# Altium PCB PCB1.PcbDoc
Units mil, origin at the board's own origin, x right, y up, seen from the top; angles counter-clockwise.
Board outline 6000 x 4000 mil, 2 copper layers (Top Layer, Bottom Layer); 158 components, 75 nets, 469 pads, 0 vias.
Unrouted connection lines stored in the file: 227.
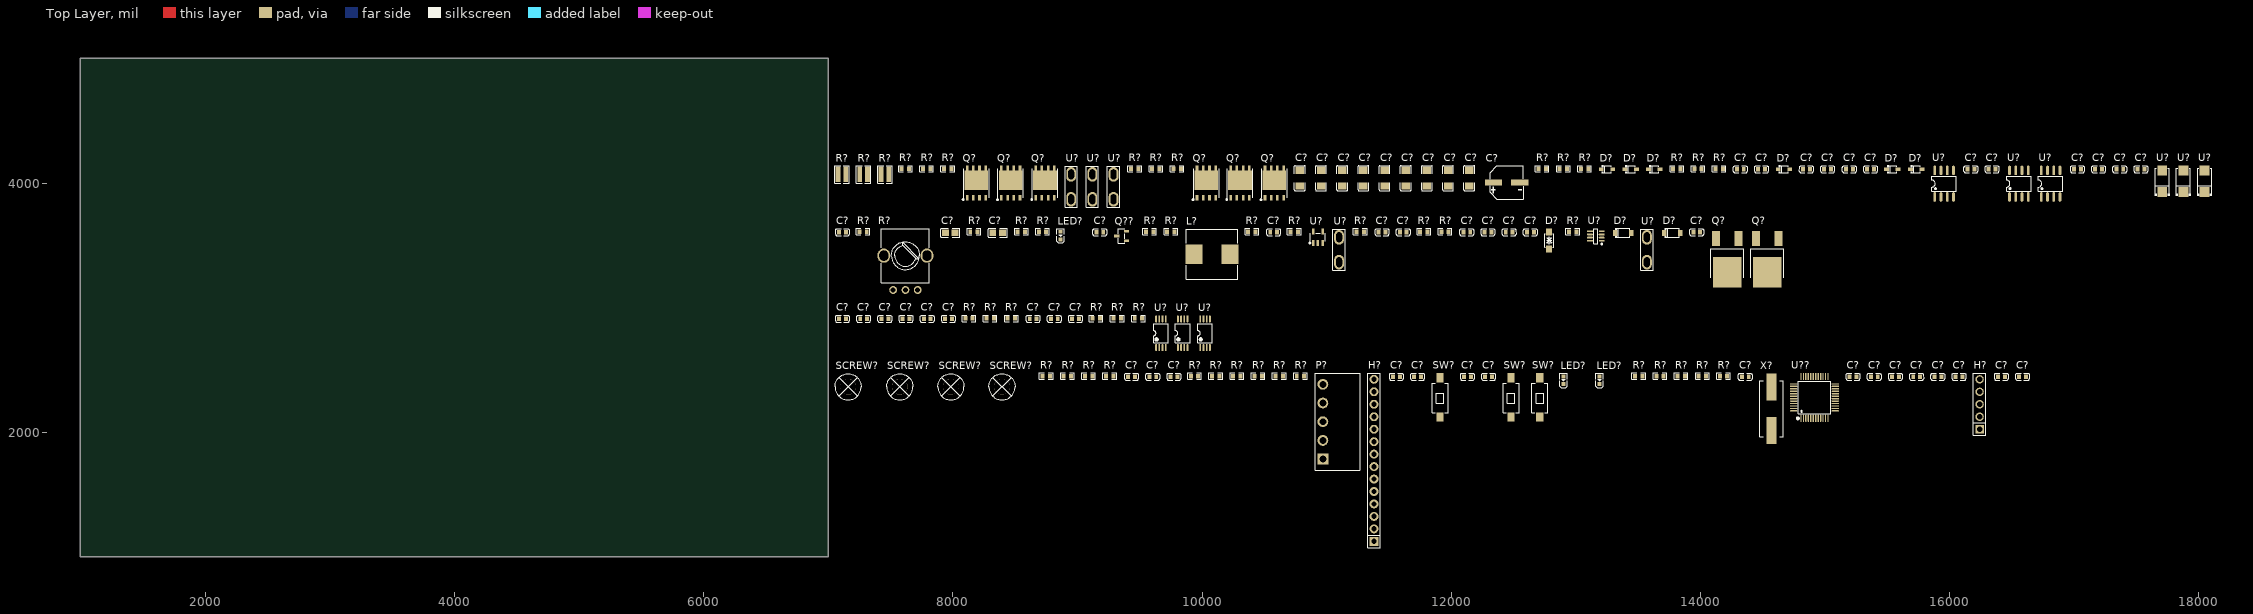
[diagram p0: Top Layer view]
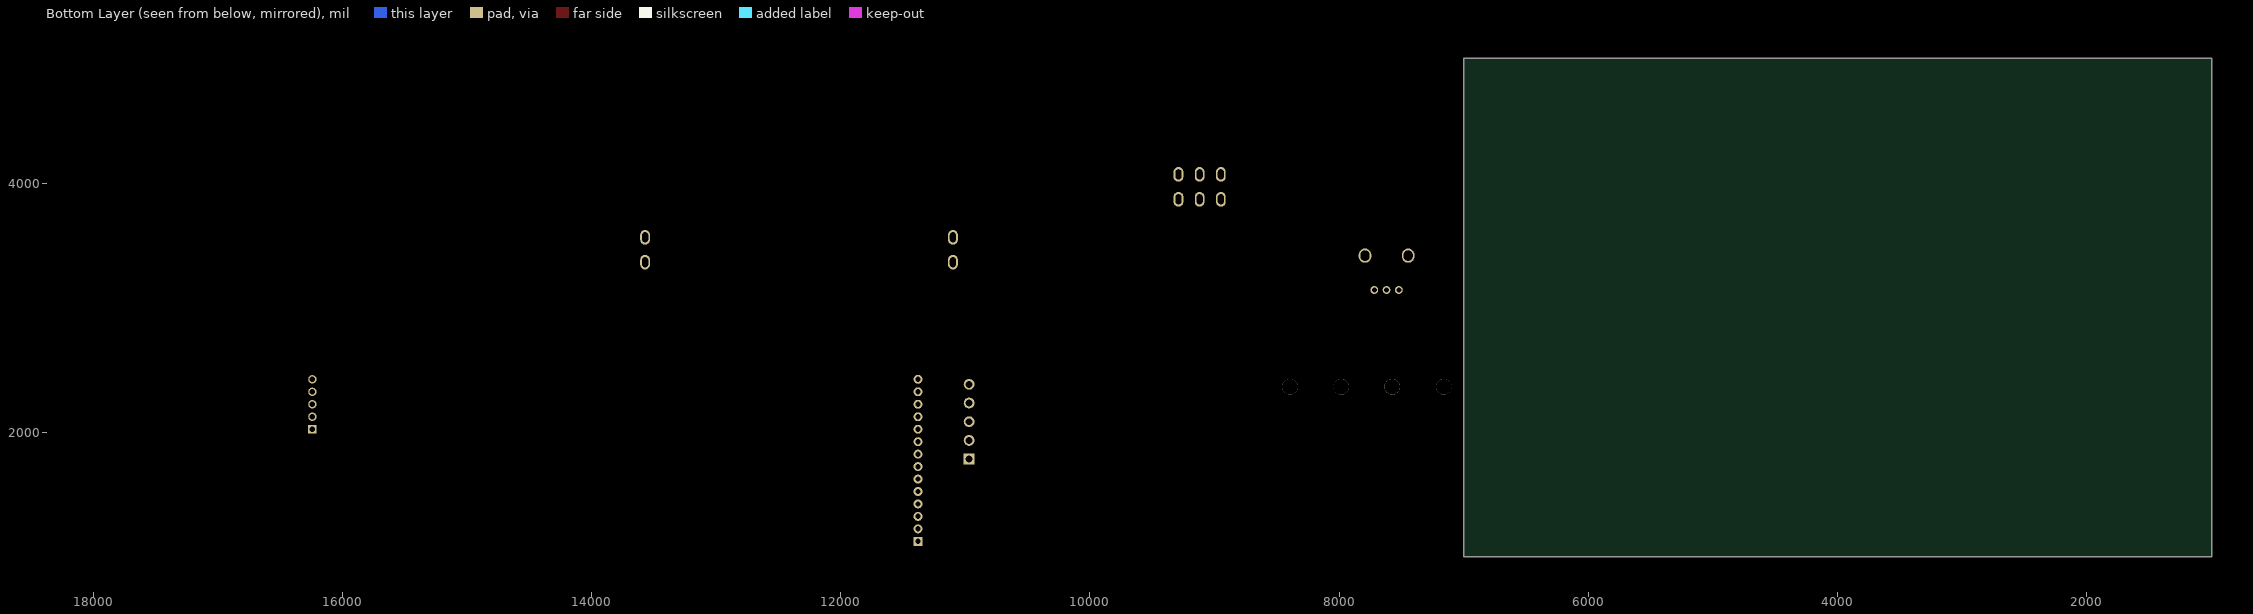
[diagram p1: Bottom Layer view, seen from below]

## Layer stack, top to bottom
Top Solder: solder mask 0.4, Solder Resist, Dk 3.5
Top Layer: signal copper 1.4
Dielectric 1: dielectric 12.6, FR-4, Dk 4.8
Bottom Layer: signal copper 1.4
Bottom Solder: solder mask 0.4, Solder Resist, Dk 3.5

## Board outline
1000,1000 7000,1000 7000,5000 1000,5000

## Design rules (kind name [scope] priority, off if disabled: settings)
Clearance [All] p1: gap=10 ignorepadtopadclearanceinfootprint=FALSE except(0: Arc-Hole Track-Hole SMDPad-Hole THPad-Hole Via-Hole Fill-Hole Poly-Hole Region-Hole Text-Hole)
PolygonConnect [All] p1: connectstyle=Relief reliefconductorwidth=10 reliefentries=4 polygonreliefangle="90 Angle" airgapwidth=10
RoomDefinition PreDriver [InComponentClass('PreDriver')] p1: confinementstyle=ConfineIn formatcopy=TRUE lockcomponents=FALSE outline 7045,2405 18115,2405 18115,4250 7045,4250
RoomDefinition POWER [InComponentClass('POWER')] p2: confinementstyle=ConfineIn formatcopy=TRUE lockcomponents=FALSE outline 7045,2350 18115,2350 18115,4250 7045,4250
RoomDefinition OPA [InComponentClass('OPA')] p3: confinementstyle=ConfineIn formatcopy=TRUE lockcomponents=FALSE outline 7045,2405 18115,2405 18115,4250 7045,4250
RoomDefinition MCU [InComponentClass('MCU')] p4: confinementstyle=ConfineIn formatcopy=TRUE lockcomponents=FALSE outline 7045,1065 17600,1065 17600,4250 7045,4250
RoutingVias [All] p1: holewidth=28 width=50 viastyle="Through Hole" minholewidth=28 minwidth=50 maxholewidth=28 maxwidth=50
SolderMaskExpansion [All] p1: expansion=4 istentingtop=FALSE
Width [All] p1: maxlimit=10 minlimit=10 preferedwidth=10
30 further rules are at their usual default settings.

## Classes and differential pairs
component class PreDriver: C? D? Q? R? U?
component class POWER: C? D? L? LED? Q? Q?? R? U?
component class OPA: C? R? U?
component class MCU: C? H? LED? P? R? SCREW? SW? U?? X?

## Components (designator, comment, footprint, x,y, rotation, side; value= is the part's Value field where it differs from the comment)
C? "1uF" C0603 15905,2445 r0 top
C? "100nF" C0603 12130,2445 r0 top
C? "1nF" C0603 9605,2445 r0 top
C? "100nF" C0603 11730,2445 r0 top
C? "100nF" C0603 15735,2445 r0 top
C? "100nF" C0603 16075,2445 r0 top
C? "100nF" C0603 11560,2445 r0 top
C? "1nF" C0603 9775,2445 r0 top
C? "1nF" C0603 9435,2445 r0 top
C? "100nF" C0603 15395,2445 r0 top
C? "100nF" C0603 16415,2445 r0 top
C? "My_Library_Cap-0603" C0603 14360,2445 r0 top value=22pF
C? "100nF" C0603 12300,2445 r0 top
C? "1uF" C0603 15565,2445 r0 top
C? "My_Library_Cap-0603" C0603 16585,2445 r0 top value=22pF
C? "1uF" C0603 15225,2445 r0 top
C? "1 nF" C0603 8815,2910 r0 top
C? "0.1 μF" C0603 7625,2910 r0 top
C? "1 nF" C0603 8985,2910 r0 top
C? "0.1 μF" C0603 7965,2910 r0 top
C? "1 μF" C0603 7455,2910 r0 top
C? "0.1 μF" C0603 7795,2910 r0 top
C? "1 nF" C0603 8645,2910 r0 top
C? "1 μF" C0603 7115,2910 r0 top
C? "1 μF" C0603 7285,2910 r0 top
C? "22uF" C0603 12635,3605 r0 top
C? "1uF" C0603 11445,3605 r0 top
C? "100nF 0603" C0603 7115,3605 r0 top
C? "22uF" C0805 7980,3600 r0 top
C? "22uF" C0805 8360,3600 r0 top
C? "0.1uF" C0603 12295,3605 r0 top
C? "0.1uF" C0603 10575,3605 r0 top
C? "22uF" C0603 12125,3605 r0 top
C? "1uF" C0603 11615,3605 r0 top
C? "33pF" C0603 9180,3605 r0 top
C? "22uF" C0603 12465,3605 r0 top
C? "0.1uF" C0603 13970,3605 r0 top
C? "10 μF" C0603 14850,4110 r0 top
C? "100nF" C1206 11805,4040 r90 top
C? "1 μF" C0603 17195,4110 r0 top
C? "10uF" C1206 12145,4040 r90 top
C? "0.1 μF" C0603 15020,4110 r0 top
C? "100nF" C1206 11295,4040 r90 top
C? "1 μF" C0603 17535,4110 r0 top
C? "0.1 μF" C0603 17365,4110 r0 top
C? "10uF" C1206 11465,4040 r90 top
C? "0.1 μF" C0603 15365,4110 r0 top
C? "10 μF" C0603 14320,4110 r0 top
C? "10uF" C1206 11975,4040 r90 top
C? "1 μF" C0603 16340,4110 r0 top
C? "10uF" C1206 10955,4040 r90 top
C? "220uF" CAP-SMD_BD6.3-L6.6-W6.6-FD 12445,4005 r0 top
C? "0.1 μF" C0603 16170,4110 r0 top
C? "0.1 μF" C0603 14490,4110 r0 top
C? "10uF" C1206 11125,4040 r90 top
C? "10uF" C1206 11635,4040 r90 top
C? "0.1 μF" C0603 17025,4110 r0 top
C? "100nF" C1206 10785,4040 r90 top
C? "10 μF" C0603 15195,4110 r0 top
D? "BZT52C16" SOD-123_L2.7-W1.6-LS3.7-RD 13380,3600 r0 top
D? "SMF30CA" SOD-123_L2.7-W1.8-LS3.7-BI 12785,3540 r90 top
D? "BZT52C16" SOD-123_L2.7-W1.6-LS3.7-RD 13775,3600 r0 top
D? "1N4148WS" SOD-323_L1.8-W1.3-LS2.5-RD 13440,4110 r0 top
D? "1N4148WS" SOD-323_L1.8-W1.3-LS2.5-RD 15540,4110 r0 top
D? "1N4148WS" SOD-323_L1.8-W1.3-LS2.5-RD 13630,4110 r0 top
D? "1N4148WS" SOD-323_L1.8-W1.3-LS2.5-RD 14670,4110 r0 top
D? "1N4148WS" SOD-323_L1.8-W1.3-LS2.5-RD 13250,4110 r0 top
D? "1N4148WS" SOD-323_L1.8-W1.3-LS2.5-RD 15730,4110 r0 top
H? "HDR-M_2.54_1x5P" HDR-TH_5P-P2.54-V-M 16240,2225 r90 top
H? "HDR-M_2.54_1x14P" HDR-TH_14P-P2.54-V-M 11380,1775 r90 top
L? "5.5uH" IND-SMD_L10.5-W10.2-HSB-1050 10080,3430 r0 top
LED? "LED_0603-R" LED_0603 13190,2420 r90 top
LED? "LED_0603-R" LED_0603 12900,2420 r90 top
LED? "" LED_0603 8865,3580 r90 top
P? "WJ15EDGRC-3.81-5P" CONN-TH_5P-P3.81_WJ15EDGRC-3.81-5P 10970,2085 r90 top
Q? "AOD4185" TO-252-2_L6.6-W6.1-P4.57-LS9.9-BR-CW 14215,3420 r90 top
Q? "AOD4185" TO-252-2_L6.6-W6.1-P4.57-LS9.9-BR-CW 14535,3420 r90 top
Q? "ne006ng" DFN5X6-8_L5.8-W5.0-P1.27-LS6.2-BL-EP 8465,4000 r0 top
Q? "ne006ng" DFN5X6-8_L5.8-W5.0-P1.27-LS6.2-BL-EP 8740,4000 r0 top
Q? "ne006ng" DFN5X6-8_L5.8-W5.0-P1.27-LS6.2-BL-EP 10580,4000 r0 top
Q? "ne006ng" DFN5X6-8_L5.8-W5.0-P1.27-LS6.2-BL-EP 10305,4000 r0 top
Q? "ne006ng" DFN5X6-8_L5.8-W5.0-P1.27-LS6.2-BL-EP 8190,4000 r0 top
Q? "ne006ng" DFN5X6-8_L5.8-W5.0-P1.27-LS6.2-BL-EP 10035,4000 r0 top
Q?? "s8050_c20069125" SOT-23-3_L2.9-W1.3-P1.90-LS2.3-BR 9355,3575 r0 top
R? "4.7K" R0603 14015,2450 r0 top
R? "4.7K" R0603 13505,2450 r0 top
R? "0R" R0603 8750,2450 r0 top value=2K
R? "4.7K" R0603 14185,2450 r0 top
R? "0R" R0603 9260,2450 r0 top value=2K
R? "2K" R0603 10790,2450 r0 top
R? "2K" R0603 10280,2450 r0 top
R? "2K" R0603 10450,2450 r0 top
R? "4.7K" R0603 13845,2450 r0 top
R? "4.7K" R0603 13675,2450 r0 top
R? "0R" R0603 9090,2450 r0 top value=2K
R? "2K" R0603 10110,2450 r0 top
R? "2K" R0603 9940,2450 r0 top
R? "0R" R0603 8920,2450 r0 top value=2K
R? "2K" R0603 10620,2450 r0 top
R? "10R" R0603 9150,2915 r0 top
R? "10R" R0603 8300,2915 r0 top
R? "10R" R0603 9320,2915 r0 top
R? "10R" R0603 8470,2915 r0 top
R? "10R" R0603 9490,2915 r0 top
R? "10R" R0603 8130,2915 r0 top
R? "10K" R0603 8720,3610 r0 top
R? "40.2K" R0603 8550,3610 r0 top
R? "1K" R0603 11270,3610 r0 top value=10K
R? "My_Library_Res-0603" R0603 10400,3610 r0 top value=4.7k
R? "7.5K" R0603 8170,3610 r0 top
R? "4.7K" R0603 9750,3610 r0 top value=10K
R? "100K" R0603 11950,3610 r0 top
R? "20" R0603 10740,3610 r0 top
R? "20K" R0603 9580,3610 r0 top
R? "10K" R0603 12975,3610 r0 top
R? "10K" R0603 11780,3610 r0 top
R? "R09022N0-FB20B7.0-B503-000" RES-ADJ-TH_R09022N0-FB20B7B503-0004 7620,3280 r0 top
R? "1K 0603" R0603 7280,3610 r0 top
R? "5mΩ" R0612 7455,4070 r0 top
R? "20K" R0603 9630,4115 r0 top
R? "10R" R0603 12730,4115 r0 top
R? "20K" R0603 7790,4115 r0 top
R? "20K" R0603 9800,4115 r0 top
R? "20K" R0603 7960,4115 r0 top
R? "10R" R0603 14150,4115 r0 top
R? "10R" R0603 13070,4115 r0 top
R? "20K" R0603 9460,4115 r0 top
R? "10R" R0603 13980,4115 r0 top
R? "10R" R0603 12900,4115 r0 top
R? "20K" R0603 7620,4115 r0 top
R? "5mΩ" R0612 7110,4070 r0 top
R? "5mΩ" R0612 7285,4070 r0 top
R? "10R" R0603 13810,4115 r0 top
SCREW? "M3螺丝" "PCBComponent_1 - duplicate" 8395,2365 r90 top
SCREW? "M3螺丝" "PCBComponent_1 - duplicate" 7985,2365 r90 top
SCREW? "M3螺丝" "PCBComponent_1 - duplicate" 7160,2365 r90 top
SCREW? "M3螺丝" "PCBComponent_1 - duplicate" 7575,2365 r90 top
SW? "TS-1101-C-W" SW-SMD_L6.0-W3.3-LS8.0 12480,2280 r90 top
SW? "TS-1101-C-W" SW-SMD_L6.0-W3.3-LS8.0 12710,2280 r90 top
SW? "TS-1101-C-W" SW-SMD_L6.0-W3.3-LS8.0 11910,2280 r90 top
U? "INA240A2PWR" TSSOP-8_L4.4-W3.0-P0.65-LS6.4-BL 9670,2795 r0 top
U? "INA240A2PWR" TSSOP-8_L4.4-W3.0-P0.65-LS6.4-BL 9845,2795 r0 top
U? "INA240A2PWR" TSSOP-8_L4.4-W3.0-P0.65-LS6.4-BL 10025,2795 r0 top
U? "RT9013-33GB" SOT-23-5_L3.0-W1.7-P0.95-LS2.8-BL 10930,3565 r0 top
U? "EST026" CONN-TH_L6.3-W0.8-EST026 13570,3465 r90 top
U? "EST026" CONN-TH_L6.3-W0.8-EST026 11100,3465 r90 top
U? "MP2315GJ-Z" TSOT-23-8_L2.9-W1.6-P0.65-LS2.8-BR 13160,3575 r0 top
U? "SS310肖特基二极管SMA" SMA_L4.3-W2.6-LS5.1-R-RD 17705,4015 r90 top
U? "SS310肖特基二极管SMA" SMA_L4.3-W2.6-LS5.1-R-RD 18045,4015 r90 top
U? "EST026" CONN-TH_L6.3-W0.8-EST026 9290,3970 r90 top
U? "IR2101STRPBF" SOIC-8_L5.0-W4.0-P1.27-LS6.0-BL 16555,3995 r0 top
U? "IR2101STRPBF" SOIC-8_L5.0-W4.0-P1.27-LS6.0-BL 16810,3995 r0 top
U? "EST026" CONN-TH_L6.3-W0.8-EST026 9120,3970 r90 top
U? "EST026" CONN-TH_L6.3-W0.8-EST026 8950,3970 r90 top
U? "SS310肖特基二极管SMA" SMA_L4.3-W2.6-LS5.1-R-RD 17875,4015 r90 top
U? "IR2101STRPBF" SOIC-8_L5.0-W4.0-P1.27-LS6.0-BL 15955,3995 r0 top
U?? "stm32g473cbt6" LQFP-48_L7.0-W7.0-P0.50-LS9.0-BL 14915,2280 r0 top
X? "8MHz" CRYSTAL-SMD_L11.5-W4.8-LS12.7 14570,2190 r90 top

## Footprints (in the part's own frame and the unit in brackets; to place one, negate y for a bottom-side part, rotate by r counter-clockwise, add the part's x,y. Pads: shape width x height; smd on the part's side, far side on the other; paste and mask are expansions set on the pad)
C0603 [mil]
  rect 31.5x35.4 smd: 1(-27.58,0) 2(27.58,0)
  silkscreen extent -55,-28 55,28
C0805 [mm]
  rect 1.41x1.35 smd paste-100 mask+0.051: 1(-1,0) 2(1,0)
  silkscreen extent -1.96,-0.9 1.96,0.9
C1206 [mm]
  rect 1.485x1.728 smd paste-100 mask+0.051: 1(-1.593,0) 2(1.593,0)
  silkscreen extent -2.56,-1.09 2.56,1.09
CAP-SMD_BD6.3-L6.6-W6.6-FD [mm]
  rect 3.5x1.2 smd paste+0.051: 1(-2.67,0) 2(2.67,0)
  silkscreen extent -3.38,-3.38 3.38,3.38
CONN-TH_5P-P3.81_WJ15EDGRC-3.81-5P [mil]
  rect 86.6x86.6 hole 55.1: 1(-300,0)
  round 86.6 hole 55.1: 2(-150,0) 3(0,0) 4(150,0) 5(300,0)
  silkscreen extent -390,-300 390,63
CONN-TH_L6.3-W0.8-EST026 [mil]
  oval 118.1x78.7 hole 47.2 slot 78.7 at 0 deg: 1(-100,0) 2(100,0)
  silkscreen extent -165,-49 165,49
CRYSTAL-SMD_L11.5-W4.8-LS12.7 [mm]
  rect 5.5x2 smd paste+0.051: 1(-4.45,0) 2(4.45,0)
  silkscreen extent -5.7,-2.4 5.7,2.4
DFN5X6-8_L5.8-W5.0-P1.27-LS6.2-BL-EP [mm]
  rect 0.55x1.1 smd paste-100 mask+0.05: 1(-1.905,-3.025) 2(-0.635,-3.025) 3(0.635,-3.025) 4(1.905,-3.025) 5(1.905,3.025) 6(0.635,3.025) 7(-0.635,3.025) 8(-1.905,3.025)
  rect 4.8x4 smd paste-100 mask+0.05: 8(0,0.61)
  silkscreen extent -2.85,-3.53 2.6,2.92
HDR-TH_5P-P2.54-V-M [mil]
  rect 66.9x66.9 hole 43.3: 1(-200,0)
  round 66.9 hole 43.3: 2(-100,0) 3(0,0) 4(100,0) 5(200,0)
  silkscreen extent -250,-50 250,50
HDR-TH_14P-P2.54-V-M [mil]
  rect 70.9x70.9 hole 43.3: 1(-650,0)
  round 70.9 hole 43.3: 2(-550,0) 3(-450,0) 4(-350,0) 5(-250,0) 6(-150,0) 7(-50,0) 8(50,0) 9(150,0) 10(250,0) 11(350,0) 12(450,0) 13(550,0) 14(650,0)
  silkscreen extent -700,-49 700,49
IND-SMD_L10.5-W10.2-HSB-1050 [mm]
  rect 3.5x4 smd paste+0.051: 1(-3.65,0) 2(3.65,0)
  silkscreen extent -5.25,-5.1 5.25,5.1
LED_0603 [mil]
  rect 31.5x31.5 smd paste+0 mask+2: 1(-33.5,-0.4) 2(29.5,-0.2)
  silkscreen extent -61,-30 53,30
LQFP-48_L7.0-W7.0-P0.50-LS9.0-BL [mm]
  oval 0.27x1.5 smd paste+0 mask+0.05: 1(-2.75,-4.25) 2(-2.25,-4.25) 3(-1.75,-4.25) 4(-1.25,-4.25) 5(-0.75,-4.25) 6(-0.25,-4.25) 7(0.25,-4.25) 8(0.75,-4.25) 9(1.25,-4.25) 10(1.75,-4.25) 11(2.25,-4.25) 12(2.75,-4.25) 25(2.75,4.25) 26(2.25,4.25) 27(1.75,4.25) 28(1.25,4.25) 29(0.75,4.25) 30(0.25,4.25) 31(-0.25,4.25) 32(-0.75,4.25) 33(-1.25,4.25) 34(-1.75,4.25) 35(-2.25,4.25) 36(-2.75,4.25)
  oval 1.5x0.27 smd paste+0 mask+0.05: 13(4.25,-2.75) 14(4.25,-2.25) 15(4.25,-1.75) 16(4.25,-1.25) 17(4.25,-0.75) 18(4.25,-0.25) 19(4.25,0.25) 20(4.25,0.75) 21(4.25,1.25) 22(4.25,1.75) 23(4.25,2.25) 24(4.25,2.75) 37(-4.25,2.75) 38(-4.25,2.25) 39(-4.25,1.75) 40(-4.25,1.25) 41(-4.25,0.75) 42(-4.25,0.25) 43(-4.25,-0.25) 44(-4.25,-0.75) 45(-4.25,-1.25) 46(-4.25,-1.75) 47(-4.25,-2.25) 48(-4.25,-2.75)
  silkscreen extent -3.59,-4.46 3.3,3.34
"PCBComponent_1 - duplicate" [mil]
  round 126 hole 126 paste+0 mask+4: 1(0,0)
  silkscreen extent -105,-105 105,105
R0603 [mil]
  rect 31.8x34 smd paste-3937 mask+2: 1(-29.7,0) 2(29.7,0)
  silkscreen extent -54,-26 54,26
R0612 [mm]
  rect 1x3.2 smd paste+0.051: 1(-0.8,0) 2(0.8,0)
  silkscreen extent -1.47,-1.78 1.47,1.78
RES-ADJ-TH_R09022N0-FB20B7B503-0004 [mil]
  round 63 hole 39.4: 1(-98.4,-137.8) 2(0,-137.8) 3(98.4,-137.8)
  oval 102.4x114.2 hole 70.9 slot 82.7 at 90 deg: 4(173.2,137.8) 5(-173.2,137.8)
  silkscreen extent -193,-79 193,354
SMA_L4.3-W2.6-LS5.1-R-RD [mm]
  rect 2x2 smd paste+0.051: 1(2.2,0) 2(-2.2,0)
  silkscreen extent -2.98,-1.5 2.6,1.5
SOD-123_L2.7-W1.6-LS3.7-RD [mm]
  rect 0.91x1.22 smd paste+0.051: 1(-1.635,0) 2(1.635,0)
  silkscreen extent -1.6,-1 1.38,1
SOD-123_L2.7-W1.8-LS3.7-BI [mm]
  rect 1.4x1.2 smd paste+0.051: 1(-1.735,0) 2(1.735,0)
  silkscreen extent -1.38,-0.93 1.38,0.93
SOD-323_L1.8-W1.3-LS2.5-RD [mm]
  rect 1x0.7 smd paste+0.051: 1(-1.172,0) 2(1.172,0)
  silkscreen extent -1.08,-0.8 0.9,0.8
SOIC-8_L5.0-W4.0-P1.27-LS6.0-BL [mil]
  oval 22.38x76.78 smd paste+2: 1(-75,-106.5) 2(-25,-106.5) 3(25,-106.5) 4(75,-106.5) 5(75,106.5) 6(25,106.5) 7(-25,106.5) 8(-75,106.5)
  silkscreen extent -98,-59 98,59
SOT-23-3_L2.9-W1.3-P1.90-LS2.3-BR [mm]
  rect 1.07x0.532 smd: 1(0.99,-0.95) 2(0.99,0.95) 3(-0.99,0)
  silkscreen extent -0.66,-1.45 0.64,1.45
SOT-23-5_L3.0-W1.7-P0.95-LS2.8-BL [mm]
  rect 0.49x1.157 smd paste+0.051: 1(-0.95,-1.154) 2(0,-1.154) 3(0.95,-1.154)
  rect 0.49x1.175 smd paste+0.051: 4(0.95,1.154) 5(-0.95,1.154)
  silkscreen extent -1.8,-1.29 1.53,0.85
SW-SMD_L6.0-W3.3-LS8.0 [mil]
  rect 74.8x59.1 smd: 1(-157.5,0) 2(157.5,0)
  silkscreen extent -124,-66 113,64
TO-252-2_L6.6-W6.1-P4.57-LS9.9-BR-CW [mm]
  rect 3x1.6 smd paste+0.051: 1(3.424,-2.29) 3(3.424,2.29)
  rect 6.2x5.8 smd paste+0.051: 2(-3.424,0)
  silkscreen extent -4.58,-3.35 1.38,3.35
TSOT-23-8_L2.9-W1.6-P0.65-LS2.8-BR [mil]
  oval 48.11x14.33 smd paste+2: 1(47.68,-38.39) 2(47.68,-12.8) 3(47.68,12.79) 4(47.68,38.39) 5(-47.68,38.39) 6(-47.68,12.79) 7(-47.68,-12.8) 8(-47.68,-38.39)
  silkscreen extent -15,-69 54,60
TSSOP-8_L4.4-W3.0-P0.65-LS6.4-BL [mil]
  oval 13.9x57.24 smd paste+2: 1(-38.39,-115.24) 2(-12.79,-115.24) 3(12.8,-115.24) 4(38.39,-115.24) 5(38.39,115.24) 6(12.8,115.24) 7(-12.79,115.24) 8(-38.39,115.24)
  silkscreen extent -59,-76 59,77

## Part data
C? C? C?: library part CAP_0603_2, AddInBom=yes, ConvertToPcb=yes, Device=CAP_0603, FootprintName=C0603, ModelId=ac125912035d415993ca9572d50418b1, ModelName=C0603_L1.6-W0.8-H0.8, ModelTransform=62.992,31.496,0,0,0,0,0,0,0, Supplier Footprint=0603, SymbolName=CapAcitance
C? C? C? C? C? C? C? C? C? C? C? C? C? C? C? C? C? C? C? C? C? C? C? C? C? C? C? C? C? C? C? C? C? C? C? C? C?: library part CAP_0603, AddInBom=yes, ConvertToPcb=yes, Device=CAP_0603, FootprintName=C0603, ModelName=C0603_L1.6-W0.8-H0.8, Supplier Footprint=0603
  C? C? C? C? C? C? C? C? C?: ModelId=ac125912035d415993ca9572d50418b1, ModelTransform=62.992,31.496,0,0,0,0,0,0,0, SymbolName=CapAcitance
  C? C? C? C? C? C? C? C? C? C? C? C? C? C? C? C? C? C? C? C? C? C? C? C? C? C? C? C?: 3D Model=ac125912035d415993ca9572d50418b1聨0819f05c4eef4c71ace90d822a990e87, 3D Model Transform=62.992,31.496,0,0,0,0,0,0,0, Symbol=Capacitance
C? C? C?: library part CAP_0603_3, AddInBom=yes, ConvertToPcb=yes, Device=CAP_0603, FootprintName=C0603, ModelId=ac125912035d415993ca9572d50418b1, ModelName=C0603_L1.6-W0.8-H0.8, ModelTransform=62.992,31.496,0,0,0,0,0,0,0, Supplier Footprint=0603, SymbolName=CapAcitance
C? C?: library part CL10B105KA8NNNC, "容值:1uF;精度:±10%;额定电压:25V;温度系数:X7R;", JLCPCB Part Class="Extended Part", LCSC Part Name="1uF ±10% 25V", Manufacturer=SAMSUNG(三星), Temperature Coefficient=X7R, Tolerance=±10%, Voltage Rating=25V, 3D Model=ac125912035d415993ca9572d50418b1聨0819f05c4eef4c71ace90d822a990e87, 3D Model Transform=62.992,31.496,0,0,0,0,0,0,0, AddInBom=yes, ConvertToPcb=yes, Datasheet=https://item.szlcsc.com/datasheet/CL10B105KA8NNNC/30690.html, Device=CL10B105KA8NNNC, FootprintName=C0603, Manufacturer Part=CL10B105KA8NNNC, ModelName=C0603_L1.6-W0.8-H0.8, Supplier=LCSC, Supplier Footprint=0603, Supplier Part=C29936, Symbol=CL10B105KA8NNNC
C? C?: library part CAP_0805, 3D Model=1ba041120af144c991958decab20d241聨0819f05c4eef4c71ace90d822a990e87, 3D Model Transform=78.74,51.181,0,0,0,0,0,0.0005,0, AddInBom=yes, ConvertToPcb=yes, Device=CAP_0805, FootprintName=C0805, ModelName=C0805_L2.0-W1.3-H1.3, Supplier Footprint=0805, Symbol=Capacitance
C? C? C?: library part CL31B104KBCNNNC, "容值:100nF;精度:±10%;额定电压:50V;温度系数:X7R;", JLCPCB Part Class="Basic Part", LCSC Part Name="100nF ±10% 50V", Manufacturer=SAMSUNG(三星), Temperature Coefficient=X7R, Tolerance=±10%, Voltage Rating=50V, AddInBom=yes, ConvertToPcb=yes, Datasheet=https://item.szlcsc.com/datasheet/CL31B104KBCNNNC/25237.html, Device=CL31B104KBCNNNC, FootprintName=C1206, ManufacturerPart=CL31B104KBCNNNC, ModelId=e4be705b945545a48e666415e3682bd8聨0819f05c4eef4c71ace90d822a990e87, ModelName=C1206_L3.2-W1.6-H1.3, ModelTransform=125.984,62.992,0,0,0,0,0,0,0, Supplier=LCSC, Supplier Footprint=1206, SupplierPart=C24497, Symbol=CL31B104KBCNNNC
C? C? C? C? C? C?: library part HGC1206R5106M500NSPJ, "容值:10uF;精度:±20%;额定电压:50V;温度系数:X5R;", JLCPCB Part Class="Extended Part", LCSC Part Name="10uF ±20% 50V", Manufacturer=Chinocera(华瓷), Temperature Coefficient=X5R, Tolerance=±20%, Voltage Rating=50V, AddInBom=yes, ConvertToPcb=yes, Datasheet=https://item.szlcsc.com/datasheet/HGC1206R5106M500NSPJ/8438264.html, Device=HGC1206R5106M500NSPJ, FootprintName=C1206, ManufacturerPart=HGC1206R5106M500NSPJ, ModelId=e4be705b945545a48e666415e3682bd8聨0819f05c4eef4c71ace90d822a990e87, ModelName=C1206_L3.2-W1.6-H1.3, ModelTransform=125.984,62.992,0,0,0,0,0,0,0, Supplier=LCSC, Supplier Footprint=1206, SupplierPart=C7432782, Symbol=HGC1206R5106M500NSPJ
C?: library part JVJ35V220M6x8, "容值:220uF;精度:±20%;额定电压:35V;纹波电流:190mA@120Hz;", JLCPCB Part Class="Extended Part", LCSC Part Name="220uF ±20% 35V", Manufacturer=JIERR(捷而瑞), Operating Temperature=-55℃~+105℃, Ripple Current=190mA@120Hz, Tolerance=±20%, Voltage Rating=35V, AddInBom=yes, ConvertToPcb=yes, Datasheet=https://item.szlcsc.com/datasheet/JVJ35V220M6x8/48680105.html, Device=JVJ35V220M6x8, Diameter=6.3mm, FootprintName=CAP-SMD_BD6.3-L6.6-W6.6-FD, Height - Seated (Max)=7.7mm, Lifetime=2000hrs@105℃, ManufacturerPart=JVJ35V220M6x8, ModelId=ec7f1c7bda5e4386b54ec5ff3d1d94ff聨0819f05c4eef4c71ace90d822a990e87, ModelName=CAP-SMD_BD6.3-L6.6-W6.6-FD, ModelTransform=307.086,259.842,0,180,0,0,0,0,0, Supplier=LCSC, Supplier Footprint=SMD,D6.3xL7.7mm, SupplierPart=C46550411, Symbol=JVJ35V220M6X8
D? D?: "二极管配置:独立式;稳压值(标称值):16V;稳压值(范围):15.3V~17.1V;耗散功率(Pd):500mW;", JLCPCB Part Class="Extended Part", LCSC Part Name="独立式 耐压:16V 电流:0.1uA", Manufacturer=Slkor(萨科微), Operating Junction Temperature Range=-65℃~+150℃, Pd - Power Dissipation=500mW, Reverse Leakage Current (Ir)=100nA, Zener Voltage(Nom)=16V, Zener Voltage(Range)=15.3V~17.1V, 3D Model=ad7e39f9e5534b3c96ffdc5532ebb493聨0819f05c4eef4c71ace90d822a990e87, 3D Model Transform=146.026,62.992,0,180,0,0,0.0005,0,0, AddInBom=yes, ConvertToPcb=yes, Datasheet=https://item.szlcsc.com/datasheet/BZT52C16/744267.html, Device=BZT52C16, Diode Configuration=独立式, FootprintName=SOD-123_L2.7-W1.6-LS3.7-RD, Impedance(Zzt)=40Ω, Manufacturer Part=BZT52C16, ModelName=SOD-123_L2.7-W1.6-H1.4-LS3.7, Supplier=LCSC, Supplier Footprint=SOD-123, Supplier Part=C707145, Symbol=BZT52C16_C707145
D?: "反向截止电压(Vrwm):30V;最大钳位电压:48.4V;峰值脉冲电流(Ipp):4.2A;击穿电压:33.3V;", Breakdown Voltage=33.3V, JLCPCB Part Class="Extended Part", Manufacturer=AnBon(安邦), Maximum Clamping Voltage=48.4V, Peak Pulse Current (Ipp)=4.2A, Reverse Leakage Current (Ir)=5uA, Reverse Stand-Off Voltage (Vrwm)=30V, 3D Model=8576f175c34f41329e79954aa68cc529聨0819f05c4eef4c71ace90d822a990e87, 3D Model Transform=145.669,70.866,0,0,0,0,0,0,0, AddInBom=yes, ConvertToPcb=yes, Datasheet=https://atta.szlcsc.com/upload/public/pdf/source/20191009/C435508_DB7B75E48DB0811659B52C5D7F67F4F0.pdf, Device=SMF30CA, FootprintName=SOD-123_L2.7-W1.8-LS3.7-BI, LCSC Part Name=SMF30CA, Manufacturer Part=SMF30CA, ModelName=SOD-123_L2.7-W1.8-LS3.7-BI, Supplier=LCSC, Supplier Footprint=SOD-123, Supplier Part=C435498, Symbol=SMF30CA_C435498, Type=TVS
D? D? D? D? D? D?: library part 1N4148WS_C2128, "二极管配置:独立式;整流电流:150mA;直流反向耐压(Vr):100V;正向压降(Vf):1.25V@150mA;反向恢复时间(Trr):4ns;", Current - Rectified=150mA, JLCPCB Part Class="Basic Part", LCSC Part Name="丝印T4 100V 150mA", Manufacturer=CJ(江苏长电/长晶), Non-Repetitive Peak Forward Surge Current=2A, Operating Junction Temperature Range=-, Pd - Power Dissipation=200mW, Reverse Leakage Current (Ir)=1uA@75V, Voltage - DC Reverse(Vr)=100V, Voltage - Forward(Vf@If)=1.25V@150mA, 3D Model=db63db13d9e342eb939127d413d6200b聨0819f05c4eef4c71ace90d822a990e87, 3D Model Transform=104.3305,51.181,0,0,0,0,0,-0.004,0, AddInBom=yes, ConvertToPcb=yes, Datasheet=https://item.szlcsc.com/datasheet/1N4148WS/2485.html, Device=1N4148WS_C2128, Diode Configuration=独立式, FootprintName=SOD-323_L1.8-W1.3-LS2.5-RD, Manufacturer Part=1N4148WS, ModelName=SOD-323_L1.8-W1.3-LS2.5-RD, Reverse Recovery Time (trr)=4ns, Supplier=LCSC, Supplier Footprint=SOD-323, Supplier Part=C2128, Symbol="1N4148WS T4"
H?: JLCPCB Part Class="Extended Part", Manufacturer=MINTRON(明硕), Manufacturer Part=MTP125-1105S1, AddInBom=yes, ConvertToPcb=yes, Device=HDR-M_2.54_1x5P, FootprintName=HDR-TH_5P-P2.54-V-M, ModelId=47d466e4a34f4fc5bc626cf773a24dd5, ModelName=HDR-TH_5P-P2.54-M-LI-1X5P, ModelTransform=499.999,100,0,0,0,0,0,0,-118.11, Supplier=LCSC, Supplier Footprint=插件, Supplier Part=C358687, Symbol=MTP125-1105S1
H?: "间距:2.54mm;总PIN位数:14;排数:1;插针结构:1x14P;行距:-;安装类型:直插;圆针/方针:方针;额定电流:3A;额定电压:-;配合针长度:6mm;塑高:2.5mm;端接针长度:3mm;触头材质:-;工作温度范围:-40℃~+105℃;颜色:黑色;", AddInBom=yes, ConvertToPcb=yes, Device=HDR-M_2.54_1x14P, FootprintName=HDR-TH_14P-P2.54-V-M, ModelId=d38966ad4fa34699b6d9af72e76b3bd5, ModelName=HDR-TH_14P-P2.54-M-LI-1X14P, ModelTransform=1390.155,92.913,0,0,0,0,0,0,-137.795, Supplier Footprint=插件, SupplierPart=C2894937, Symbol=HDR_2.54-1x14P
L?: library part HSB-1050-5R5-M, "电感值:5.5uH;精度:±20%;额定电流:10A;饱和电流(Isat):12A;", Current - Saturation(Isat)=12A, Current Rating=10A, DC Resistance(DCR)=10.3mΩ, JLCPCB Part Class="Extended Part", LCSC Part Name="5.5uH  ±20%  12.0A", Manufacturer=YOUCHI(佑驰), Tolerance=±20%, AddInBom=yes, ConvertToPcb=yes, Datasheet=https://item.szlcsc.com/datasheet/HSB-1050-5R5-M/56489689.html, Device=HSB-1050-5R5-M, FootprintName=IND-SMD_L10.5-W10.2-HSB-1050, Manufacturer Part=HSB-1050-5R5-M, Supplier=LCSC, Supplier Footprint=SMD,10.5x10.2mm, Supplier Part=C53373579, Symbol=HSB-1050-5R5-M
LED?: library part LED_0603-B, 3D Model=eb8d964598f24248affda46f619856c5聨0819f05c4eef4c71ace90d822a990e87, 3D Model Transform=63.1,31.6,23.7,0,0,0,0,0,0, Add into BOM=yes, Convert to PCB=yes, Device=LED_0603-B, FootprintName=LED_0603, ModelName=LED-0603_B, Supplier Footprint=0603, Symbol=LED_B
P?: "连接器类型:板端/插座-闭口;固定方式:-;结构:1x5P;间距:3.81mm;颜色:-;安装方式:弯针;排数:1;每排PIN数:5;额定电流:-;额定电压:-;线规 - AWG:-;线规 - 平方毫米:-;工作温度:-40℃~+105℃;", Color=-, JLCPCB Part Class=扩展库, LCSC Part Name="1x5P 3.81mm 排数:1 每排P数:5", Manufacturer=KANGNEX(康奈克斯电气), Operating Temperature=-40℃~+105℃, AddInBom=yes, Connection Type=-, Connector Type=板端/插座-闭口, ConvertToPcb=yes, Current Rating=-, Datasheet=https://item.szlcsc.com/datasheet/WJ15EDGRC-3.81-5P/8889.html, Device=WJ15EDGRC-3.81-5P, FootprintName=CONN-TH_5P-P3.81_WJ15EDGRC-3.81-5P, ManufacturerPart=WJ15EDGRC-3.81-5P, ModelId=1f5bfc586d7a497a94e16b2138b9ad12, ModelName=CONN-TH_WJ3.81-WI-5P, ModelTransform=784.64406,360.2355,0,0,0,0,-0.197,-118.11,-137.795, Mounting Type=弯针, Number of Pins=5P, Number of PINs Per Row=5, Number of Positions or Pins=1x5P, Number of Rows=1, Outlet Direction (Vertical Basis)=-, Pitch=3.81mm, Supplier=LCSC, Supplier Footprint=弯插,P=3.81mm, SupplierPart=C8395, Symbol=WJ15EDGRC-3.81-5P, Termination Style=-, Voltage Rating (Max)=-, Wire Gauge - AWG=-, Wire Gauge - mm2=-
Q? Q?: library part AOD4185_C2984007, JLCPCB Part Class="Extended Part", Manufacturer=ISC(无锡固电), 3D Model=ce57f84d66384067af8a68020b6de06d聨0819f05c4eef4c71ace90d822a990e87, 3D Model Transform=259.842,390.52442,0,90,0,0,-39.39,0,0, AddInBom=yes, ConvertToPcb=yes, Device=AOD4185_C2984007, FootprintName=TO-252-2_L6.6-W6.1-P4.57-LS9.9-BR-CW, LCSC Part Name=AOD4185, Manufacturer Part=AOD4185, ModelName=TO-252-2L-3P_L6.6-W6.1-H2.3-LS10.1-P4.6, Supplier=LCSC, Supplier Footprint=TO-252, Supplier Part=C2984007, Symbol=AOD4185_C2984007
Q? Q? Q? Q? Q? Q?: "数量:1个N沟道;漏源电压(Vdss):60V;连续漏极电流(Id):70A;导通电阻(RDS(on)):4.6mΩ@10V;耗散功率(Pd):84W;阈值电压(Vgs(th)):2.7V;", Current - Continuous Drain(Id)=70A, Drain to Source Voltage=60V, Gate Threshold Voltage (Vgs(th))=2.7V, Input Capacitance(Ciss)=4nF, JLCPCB Part Class="Extended Part", LCSC Part Name=N沟道MOSFET采用先进沟槽技术，具备低栅极电荷和出色散热性能, Manufacturer=DOINGTER(杜因特), ManufacturerPart=NE006NG, Operating Temperature=-50℃~+150℃, Output Capacitance(Coss)=309pF, Pd - Power Dissipation=84W, Reverse Transfer Capacitance (Crss@Vds)=252pF, AddInBom=yes, ConvertToPcb=yes, Datasheet=https://item.szlcsc.com/datasheet/NE006NG/57396370.html, FootprintName=DFN5X6-8_L5.8-W5.0-P1.27-LS6.2-BL-EP, Gate Charge(Qg)=90nC@10V, ModelId=82d86f10988147ef9b82700d9bd42f65, ModelName=DFN5X6-8_L5.8-W5.0-P1.27-LS6.2-BL-EP, ModelTransform=200.787,239.17275,0,0,0,0,0.002,-0.004,0, Number=1个N沟道, RDS(on)=4.6mΩ@10V, Supplier=LCSC, Supplier Footprint=DFN-8(5x6), SupplierPart=C54157801, SymbolName=NE006NG, Type=N沟道
Q??: "晶体管类型:NPN;集电极电流(Ic):500mA;集射极击穿电压(Vceo):25V;耗散功率(Pd):300mW;直流电流增益(hFE):120;", Collector - Emitter Voltage VCEO=25V, Current - Collector Cutoff=100nA, Current - Collector(Ic)=500mA, DC Current Gain=120, Emitter-Base Voltage(Vebo)=5V, JLCPCB Part Class="Extended Part", LCSC Part Name="hFE:200-350，丝印:J3Y NPN 500mA 25V", Manufacturer=R+O(宏嘉诚), ManufacturerPart=S8050, Operating Temperature=-55℃~+150℃, Pd - Power Dissipation=300mW, Transition frequency(fT)=100MHz, AddInBom=yes, Configuration=独立式, ConvertToPcb=yes, Datasheet=https://item.szlcsc.com/datasheet/S8050/21397163.html, FootprintName=SOT-23-3_L2.9-W1.3-P1.90-LS2.3-BR, ModelId=5504beb8757f4de79731898ec55d3e54, ModelName=SOT-23-3_L2.9-W1.3-P1.90-LS2.3-BR, ModelTransform=114.173,90.551,0,90,0,0,0,0,0, Number=1个NPN, Supplier=LCSC, Supplier Footprint=SOT-23, SupplierPart=C20069125, Symbol=S8050_C20069125, Type=NPN, Vce Saturation(VCE(sat))=600mV
R? R? R? R? R?: library part Res_0603_1, AddInBom=yes, ConvertToPcb=yes, Device=Res_0603, FootprintName=R0603, ModelId=fc143cca1e79419f9cd78b61e9279f08, ModelName=R0603, ModelTransform=31.8897,63.7794,0,90,0,0,0,0,0, Supplier Footprint=0603, Symbol=电阻
R? R? R? R? R? R? R? R? R? R? R? R? R? R? R? R? R? R? R? R? R? R? R? R? R? R? R? R? R? R? R? R? R? R? R? R? R? R? R?: library part Res_0603, AddInBom=yes, ConvertToPcb=yes, Device=Res_0603, FootprintName=R0603, ModelName=R0603, Supplier Footprint=0603, Symbol=电阻
  R? R? R? R? R? R? R? R? R? R? R?: ModelId=fc143cca1e79419f9cd78b61e9279f08, ModelTransform=31.8897,63.7794,0,90,0,0,0,0,0
  R? R? R? R? R? R? R? R? R? R? R? R? R? R? R? R? R? R? R? R? R? R? R? R? R? R? R? R?: 3D Model=fc143cca1e79419f9cd78b61e9279f08聨0819f05c4eef4c71ace90d822a990e87, 3D Model Transform=31.8897,63.7794,0,90,0,0,0,0,0
R?: "可调电阻旋转电位器", JLCPCB Part Class=扩展库, Manufacturer=CTR(长泰尔电子), Voltage Rating=10V, AddInBom=yes, ConvertToPcb=yes, Datasheet=https://atta.szlcsc.com/upload/public/pdf/source/20231010/93ED3CE9FDD6AC93F067D89ACCCFD006.pdf, Device=R09022N0-FB20B7.0-B503-000, FootprintName=RES-ADJ-TH_R09022N0-FB20B7B503-0004, LCSC Part Name=R09022N0-FB20B7.0-B503-000, ManufacturerPart=R09022N0-FB20B7.0-B503-000, ModelId=71d2ca23f0844f7d968f95a814dfb0e2, ModelName=RES-ADJ-TH_R09022N0-FB20B7B503-0004, ModelTransform=450.24737,500.038,0,0,0,0,0,104.055,-149.606, Supplier=LCSC, Supplier Footprint=插件, SupplierPart=C18213417, Symbol=R09022N0-FB20B7.0-B503-000
R? R? R?: library part MLR06A1R005F2, "电阻类型:合金电阻;阻值:5mΩ;精度:±1%;功率:1W;温度系数:±50ppm/℃;安装方式:贴片;", JLCPCB Part Class="Extended Part", LCSC Part Name="5mΩ ±1% 1W", Manufacturer=prosemi(普罗森美), Power(Watts)=1W, Temperature Coefficient=±50ppm/℃, Tolerance=±1%, AddInBom=yes, ConvertToPcb=yes, Datasheet=https://item.szlcsc.com/datasheet/MLR06A1R005F2/22679766.html, Device=MLR06A1R005F2, FootprintName=R0612, ManufacturerPart=MLR06A1R005F2, ModelId=f1de2025d8034c8f979ea2bb0fb44f5c聨0819f05c4eef4c71ace90d822a990e87, ModelName=R0612, ModelTransform=62.992,125.984,0,0,0,0,0,0,0, Mounting Type=贴片, Supplier=LCSC, Supplier Footprint=0612, SupplierPart=C21261109, Symbol=MLR06A1R005F2, Type=合金电阻
SW? SW? SW?: "电路结构:单刀单掷;按钮形状:矩形按钮;作用力:260gf;安装方式:立贴;开关长度:6mm;开关宽度:3.6mm;开关高度:2.5mm;带支架:不带;触点电流:50mA;额定电压(AC):-;额定电压(DC):12V;额定功率:-;绝缘电阻:-;带灯:无;机械寿命:5万次;", Actuator/Cap Color=白色带淡绿, Contact Current=50mA, Insulation Resistance=-, JLCPCB Part Class=扩展库, LCSC Part Name="6*3.6*2.5mm 立贴 轻触开关", Manufacturer="XKB Connectivity(中国星坤)", Operating Force=260gf, Operating Temperature=-30℃~+85℃, Voltage Rating (DC)=12V, Actuator Style=矩形按钮, AddInBom=yes, Circuit=单刀单掷, ConvertToPcb=yes, Datasheet=https://atta.szlcsc.com/upload/public/pdf/source/20200227/C318938_C2E53B1EEDE37D980A33616AC086DE53.pdf, Device=TS-1101-C-W, FootprintName=SW-SMD_L6.0-W3.3-LS8.0, IP Rating=-, ManufacturerPart=TS-1101-C-W, Mechanical Life=5万次, ModelId=b2f4ea9f0afc4b0786d53dba66ceb9e4, ModelName=SW-SMD_L6.0-W3.3-H5-LS8.0, ModelTransform=314.96,129.921,0,0,0,0,0,0,0, Mounting Style=立贴, Pin Style=-, Power Rating=-, Strike Gundam=不带, Supplier=LCSC, Supplier Footprint=SMD, SupplierPart=C318938, Switch Height=2.5mm, Switch Length=6mm, Switch Width=3.6mm, Symbol=TS-1101-C-W, Voltage Rating (AC)=-, With Lamp=无
U? U? U?: "放大器数:单路;共模电压:-4V~80V;增益:50V/V;带宽:400kHz;", Differential Voltage=-80V~+80V, Ib - Input Bias Current=90uA, Input Offset Current Drift (Ios TC)=-, Input Offset Voltage Drift(Vos TC)=250nV/℃, JLCPCB Part Class="Extended Part", LCSC Part Name=具有增强型PWM抑制功能的高侧和低侧双向零漂移电流感测放大器, Manufacturer=TI(德州仪器), Operating Temperature=-40℃~+125℃, Quiescent Current=1.8mA, Vcm - Common Mode Voltage=-4V~80V, Vos - Input Offset Voltage=5uV, 3D Model=85577802f9634e7e85ffa2fd25a37b6f聨0819f05c4eef4c71ace90d822a990e87, 3D Model Transform=118.11,251.968,0,0,0,0,0,0,0, AddInBom=yes, Bandwidth=400kHz, Common Mode Rejection Ratio (CMRR)=132dB, ConvertToPcb=yes, Datasheet=https://www.ti.com/cn/lit/gpn/ina240, Device=INA240A2PWR, Dual Supply=-, FootprintName=TSSOP-8_L4.4-W3.0-P0.65-LS6.4-BL, Gain=50V/V, Input Offset Current(Ios)=-, Manufacturer Part=INA240A2PWR, Maximum Power Supply Range (Vdd-Vss)=-, ModelName=TSSOP-8_L4.4-W3.0-P0.65-LS6.4-BL-2, Noise density(eN)=40nV/√Hz@1kHz, Number of Channels=单路, Output Current=-, Single Supply=2.7V~5.5V, Slew Rate=2V/us, Supplier=LCSC, Supplier Footprint=TSSOP-8, Supplier Part=C129949, Symbol=INA240A2PWR
U?: "输出极性:正极;工作电压:5.5V;输出电压:3.3V;输出电流:500mA;电源纹波抑制比(PSRR):50dB@(10kHz);输出类型:固定;", JLCPCB Part Class="Extended Part", LCSC Part Name="3.3V 500mA 5.5V", Manufacturer=RICHTEK(立锜), Operating Temperature=-40℃~+125℃@(Tj), Output Current=500mA, Output Voltage=3.3V, Power Supply Rejection Ratio (PSRR)=50dB@(10kHz), standby current=25uA, Voltage - Supply=5.5V, Voltage Dropout=400mV@(500mA), 3D Model=0a2a1b8f50944f73965918ad6e5fe167聨0819f05c4eef4c71ace90d822a990e87, 3D Model Transform=118.60433,114.173,0,90,0,0,0.0005,0.0005,0, AddInBom=yes, ConvertToPcb=yes, Datasheet=https://item.szlcsc.com/datasheet/RT9013-33GB/48778.html, Device=RT9013-33GB, Features=使能控制；短路保护；过流保护；热关断, FootprintName=SOT-23-5_L3.0-W1.7-P0.95-LS2.8-BL, Manufacturer Part=RT9013-33GB, ModelName=SOT-23-5_L2.9-W1.6-H1.1-LS2.8-P0.95, Noise=30uVrms, Number of Outputs=1, Output Configuration=正极, Output Type=固定, Supplier=LCSC, Supplier Footprint=SOT-23-5, Supplier Part=C47773, Symbol=RT9013-33GB
U? U? U? U? U?: "环保", JLCPCB Part Class=扩展库, Manufacturer=xcfuse(旭程), AddInBom=yes, ConvertToPcb=yes, Datasheet=https://item.szlcsc.com/datasheet/EST026/53893.html, Device=EST026, FootprintName=CONN-TH_L6.3-W0.8-EST026, LCSC Part Name=EST026, ManufacturerPart=EST026, ModelId=caeb915258b34f389ee2048176497ca2, ModelName=CONN-TH_L6.3-W0.8-EST026, ModelTransform=328.7395,78.74,0,0,0,0,0,0,-137.795, Supplier=LCSC, Supplier Footprint=插件, SupplierPart=C52878, Symbol=EST026
U?: "功能类型:降压型;工作电压:4.5V~24V;输出电压:800mV~22.8V;输出电流:3A;输出类型:可调;", Frequency - Switching=500kHz, JLCPCB Part Class="Extended Part", LCSC Part Name="降压型 3A 4.5V~24V", Manufacturer=MPS(芯源), Operating Temperature=-40℃~+125℃, Output Current=3A, Output Voltage=800mV~22.8V, Quiescent Current=180uA, Voltage - Supply=4.5V~24V, 3D Model=a4a866e84c1d4e21a00dbb6d6e7ebbb6聨0819f05c4eef4c71ace90d822a990e87, 3D Model Transform=110.45568,114.173,0,180,0,0,0,0,0, AddInBom=yes, ConvertToPcb=yes, Datasheet=https://item.szlcsc.com/datasheet/MP2315GJ-Z/46892.html, Device=MP2315GJ-Z, Features=轻载高效模式；内置LDO稳压器；频率同步；逐波限流；过流保护；打嗝限流, FootprintName=TSOT-23-8_L2.9-W1.6-P0.65-LS2.8-BR, Function=降压型, Manufacturer Part=MP2315GJ-Z, ModelName=TSOT-23-8_L2.9-W1.6-P0.65-LS2.8-BR, Number of Outputs=1, Output Type=可调, Supplier=LCSC, Supplier Footprint=TSOT-23-8, Supplier Part=C45889, Switch tube (built-in/external)=内置, Symbol=MP2315GJ-Z, Synchronous Rectifier=是, Topology=降压式
U? U? U?: JLCPCB Part Class="Extended Part", 3D Model=6890bb9641474820a71fce2135ca3aaa聨0819f05c4eef4c71ace90d822a990e87, 3D Model Transform=194.8815,98.425,0,0,0,0,0,0,0, AddInBom=yes, ConvertToPcb=yes, Device=SS310肖特基二极管SMA, FootprintName=SMA_L4.3-W2.6-LS5.1-R-RD, LCSC Part Name=SS310肖特基二极管SMA, Manufacturer Part=SS310肖特基二极管SMA, ModelName=SMA_L4.3-W2.6-LS5.1-R-RD, Supplier=LCSC, Supplier Footprint=SS310SMA110V, Supplier Part=C9900014981, Symbol=SS310肖特基二极管SMA
U? U? U?: "驱动配置:半桥;负载类型:IGBT；MOSFET;驱动通道数:2;灌电流(IOL):270mA;拉电流(IOH):130mA;工作电压:10V~20V;上升时间(tr):100ns;下降时间(tf):50ns;", Current - Output High(IOH)=130mA, Current - Output Low(IOL)=270mA, JLCPCB Part Class="Extended Part", LCSC Part Name=高低侧驱动器, Manufacturer=Infineon(英飞凌), Operating Temperature=-40℃~+150℃, Quiescent Current(Iq)=150uA, Voltage - Supply=10V~20V, 3D Model=7abc64c95a1a4a04a4ef38f9097c870b聨0819f05c4eef4c71ace90d822a990e87, 3D Model Transform=192.913,236.22,0,0,0,0,0,0,0, AddInBom=yes, ConvertToPcb=yes, Datasheet=https://item.szlcsc.com/datasheet/IR2101STRPBF/3338.html, Device=IR2101STRPBF, Driven Configuration=半桥, Fall Time=50ns, Features=交错导通保护, FootprintName=SOIC-8_L5.0-W4.0-P1.27-LS6.0-BL, Input Logic Level - High=-, Input Logic Level - Low=-, Load Type=IGBT；MOSFET, Manufacturer Part=IR2101STRPBF, ModelName=SOIC-8_L5.0-W4.0-P1.27-LS6.0-BL, Number of Drivers=2, Propagation Delay tpHL=150ns, Propagation Delay tpLH=160ns, Rise Time=100ns, Supplier=LCSC, Supplier Footprint=SOIC-8, Supplier Part=C2956, Symbol=IR2101STRPBF
U??: "CPU内核:ARM Cortex-M4;CPU最大主频:170MHz;CPU位数:32 Bit;", JLCPCB Part Class="Extended Part", LCSC Part Name="带DSP和FPU的170MHz主流ARM Cortex-M4 MCU，具有128 KB Flash存储器、数学加速器和高模拟电平集成", Manufacturer=ST(意法半导体), ManufacturerPart=STM32G473CBT6, Operating Temperature=-40℃~+85℃, Voltage - Supply=1.71V~3.6V, AddInBom=yes, ConvertToPcb=yes, Core Size="32 Bit", CPU Core="ARM Cortex-M4", CPU Maximum Speed=170MHz, Datasheet=https://item.szlcsc.com/datasheet/STM32G473CBT6/778066.html, EEPROM=-, FootprintName=LQFP-48_L7.0-W7.0-P0.50-LS9.0-BL, ModelId=093be70396ff421eb2cdb946d5311efc, ModelName=LQFP-48_L7.0-W7.0-H1.4-LS9.0-P0.50, ModelTransform=354.331,354.331,0,0,0,0,0,0,0, Number of I/O=38, Oscillator Type=内置+外置, Program Memory Type=FLASH, Program Storage Size=128KB, RAM Size=128KB, Supplier=LCSC, Supplier Footprint=LQFP-48(7x7), SupplierPart=C730111, Symbol=STM32G473CBT6
X?: library part X49SM8MSD2SC, "晶振类型:贴片晶振;频率:8MHz;常温频差:±20ppm;负载电容:20pF;频率稳定度:±30ppm;", Frequency Stability=±30ppm, JLCPCB Part Class="Basic Part", LCSC Part Name="HC-49SMD 8MHZ 20PF ±20PPM -20~70℃（±30PPM）", Load Capacitance=20pF, Manufacturer=YXC(扬兴晶振), Normal temperature Frequency Tolerance=±20ppm, Operating Temperature=-20℃~+70℃, 3D Model=6f569b91267b44029b8615eb5c810fba聨0819f05c4eef4c71ace90d822a990e87, 3D Model Transform=499.999,188.976,0,180,0,0,0.002,-0.002,0, AddInBom=yes, ConvertToPcb=yes, Datasheet=https://item.szlcsc.com/datasheet/X49SM8MSD2SC/13310.html, Device=X49SM8MSD2SC, FootprintName=CRYSTAL-SMD_L11.5-W4.8-LS12.7, Manufacturer Part=X49SM8MSD2SC, ModelName=HC-49S_L11.4-W1.8-H3.0-LS12.7, Supplier=LCSC, Supplier Footprint=HC-49S-SMD, Supplier Part=C12674, Symbol=X49SM8MSD2SC, Type=贴片晶振
C? C?: AddInBom=yes, Device=My_Library_Cap-0603, Footprint_1=0603, Origin Footprint=MyPCBLibrary:C0603, Symbol=My_Library_Cap-0603
LED? LED?: 3D Model=dd8257b0d61a4cd7b68939a056e08095, 3D Model Transform=58.72,29.4,22.03,0,0,0,0,0,0, Add into BOM=yes, Convert to PCB=yes, Device=LED_0603-R, FootprintName=LED_0603, ModelName=LED-0603_R, Supplier Footprint=0603, Symbol=LED_R
R?: AddInBom=yes, Device=My_Library_Res-0603, Footprint_1=0603, Origin Footprint=MyPCBLibrary:R0603, Symbol=My_Library_Res-0603
SCREW? SCREW? SCREW? SCREW?: AddInBom=yes, ConvertToPcb=yes, Device=M3螺丝, FootprintName=M3螺丝, Supplier Footprint=插件, SymbolName=螺丝孔

## Nets (pads, with @x,y where several pads share a name; then routed paths per layer and width w, separated by ;. In a path a pad name is that pad's centre, name@x,y a point inside that pad or via, vN(x,y) a via of type N, cw(c..) or ccw(c..) an arc to the next point about the centre after c; other vN are vias at no path point)
AGND: U??.19
EC: R?.1@9230.3,2450 U??.40
GHA: D?.2@14716.16,4110 Q?.4@10110,3880.91 R?.1@13780.3,4115 R?.2@9489.7,4115
GHB: D?.2@15586.16,4110 Q?.4@10380,3880.91 R?.1@13950.3,4115 R?.2@9659.7,4115
GHC: D?.2@15776.16,4110 Q?.4@10655,3880.91 R?.1@14120.3,4115 R?.2@9829.7,4115
GLA: D?.2@13296.16,4110 Q?.4@8265,3880.91 R?.1@12700.3,4115 R?.2@7649.7,4115
GLB: D?.2@13486.16,4110 Q?.4@8540,3880.91 R?.1@12870.3,4115 R?.2@7819.7,4115
GLC: D?.2@13676.16,4110 Q?.4@8815,3880.91 R?.1@13040.3,4115 R?.2@7989.7,4115
GND: C?.1@9407.42,2445 C?.1@9577.42,2445 C?.1@9747.42,2445 C?.1@10785,3977.3 C?.1@10955,3977.3 C?.1@11125,3977.3 C?.1@11295,3977.3 C?.1@11465,3977.3 C?.1@11635,3977.3 C?.1@11702.42,2445 C?.1@11805,3977.3 C?.1@11975,3977.3 C?.1@12097.42,3605 C?.1@12102.42,2445 C?.1@12145,3977.3 C?.1@12267.42,3605 C?.1@12272.42,2445 C?.1@12437.42,3605 C?.1@12607.42,3605 C?.1@13942.42,3605 C?.1@14292.42,4110 C?.1@14332.42,2445 C?.1@14462.42,4110 C?.1@14822.42,4110 C?.1@14992.42,4110 C?.1@15167.42,4110 C?.1@15197.42,2445 C?.1@15337.42,4110 C?.1@15367.42,2445 C?.1@15537.42,2445 C?.1@15707.42,2445 C?.1@15877.42,2445 C?.1@16047.42,2445 C?.1@16387.42,2445 C?.1@16557.42,2445 C?.2@7142.58,2910 C?.2@7142.58,3605 C?.2@7312.58,2910 C?.2@7482.58,2910 C?.2@7652.58,2910 C?.2@7822.58,2910 C?.2@7992.58,2910 C?.2@8019.37,3600 C?.2@8399.37,3600 C?.2@11472.58,3605 C?.2@11587.58,2445 C?.2@11642.58,3605 C?.2@12550.12,4005 D?.1@12785,3471.69 H?.2@16240,2125 LED?.1@8865.4,3546.5 P?.2 Q??.2 R?.1@7078.5,4070 R?.1@8140.3,3610 R?.1@11750.3,3610 R?.2@8749.7,3610 R?.3 R?.4 R?.5 SW?.1 U?.1@11100,3365 U?.2@10930,3519.58 U?.2@11100,3565 U?.4@9708.39,2679.76 U?.4@9883.39,2679.76 U?.4@10063.39,2679.76 U?.4@13207.68,3613.39 U?.4@16030,3888.5 U?.4@16630,3888.5 U?.4@16885,3888.5 U?.7@9657.21,2910.24 U?.7@9832.21,2910.24 U?.7@10012.21,2910.24 U??.23 U??.35 U??.47
H1/EA: C?.2@9802.58,2445 R?.1@10760.3,2450 U??.33
H2/EB: C?.2@9632.58,2445 R?.1@10590.3,2450 U??.34
H3: R?.2@9119.7,2450 U??.45
IBUS: U??.16
IBUS+: R?.2@9179.7,2915
IBUS-: R?.2@8159.7,2915
IU: U??.8
IU+: Q?.1@8115,3880.91 Q?.2@8165,3880.91 Q?.3@8215,3880.91 R?.1@7590.3,4115 R?.2@7316.5,4070
IU-: R?.2@8329.7,2915
IV: U??.9
IV+: Q?.1@8390,3880.91 Q?.2@8440,3880.91 Q?.3@8490,3880.91 R?.1@7760.3,4115 R?.2@7486.5,4070
IV-: R?.2@8499.7,2915
LED1: LED?.1@12900.4,2386.5 U??.13
LED2: LED?.1@13190.4,2386.5 U??.14
NetC?_1: C?.1@16142.42,4110 C?.1@16312.42,4110 U?.6@15980,4101.5
NetC?_2: C?.2@9012.58,2910 R?.1@9460.3,2915 U?.2@10012.21,2679.76
NetD?_1: D?.1@13315.63,3600 D?.1@13710.63,3600 Q?.3@14124.84,3554.8 Q?.3@14444.84,3554.8 R?.2@13004.7,3610
NetD?_2: D?.2@13444.37,3600 Q?.1@14305.16,3554.8 R?.2@11809.7,3610
NetLED?_2: LED?.2@12900.2,2449.5 R?.1@13645.3,2450
NetP?_3: P?.3 R?.1@10250.3,2450 R?.2@10819.7,2450
NetP?_4: P?.4 R?.1@10080.3,2450 R?.2@10649.7,2450
NetP?_5: P?.5 R?.1@9910.3,2450 R?.2@10479.7,2450
NetQ??_1: Q??.1 R?.1@8690.3,3610 R?.2@9779.7,3610
NetQ??_3: Q??.3 R?.1@11240.3,3610
NetQ?_1: Q?.1@9960,3880.91 Q?.2@10010,3880.91 Q?.3@10060,3880.91 Q?.5@8265,4119.1 Q?.6@8215,4119.1 Q?.7@8165,4119.1 Q?.8@8115,4119.1 Q?.8@8190,4024.01 R?.1@9430.3,4115 U?.1@8950,3870 U?.2@8950,4070
NetR?_1: R?.1@11920.3,3610 U?.6@13112.32,3587.79
NetR?_2: R?.2@9609.7,3610 U?.8@13112.32,3536.61
NetU?_2: U?.2@16530,3888.5
NetU?_3: U?.3@16835,3888.5
NetU?_8: U?.8@9631.61,2910.24
NRST: H?.5@16240,2425 U??.7
OSC_IN: C?.2@16612.58,2445 U??.5 X?.1
OSC_OUT: C?.2@14387.58,2445 U??.6 X?.2
PA2: H?.9 U??.10
PA3: H?.10 U??.11
PA4: H?.11 U??.12
PA15: H?.8 U??.39
PB4: H?.7 U??.41
PB5: H?.6 U??.42
PB6: H?.5@11380,1525 U??.43
PB7: H?.4@11380,1425 U??.44
PB9: H?.3@11380,1325 U??.46
PB10: H?.2@11380,1225 U??.22
PB11: H?.1@11380,1125 U??.25
PC13: H?.12 U??.2
PC14: H?.13 U??.3
PC15: H?.14 U??.4
POWER_IN+: C?.2@12492.58,3605 C?.2@12662.58,3605 D?.2@12785,3608.3 Q?.2@14215,3285.2 U?.1@13570,3365 U?.2@13570,3565
SPIN: U??.26
SW1: U??.15
SW2: U??.18
SWCLK: H?.4@16240,2325 U??.38
SWDIO: H?.3@16240,2225 U??.37
UN: U??.27
UP: U??.30
V: Q?.1@10230,3880.91 Q?.2@10280,3880.91 Q?.3@10330,3880.91 Q?.5@8540,4119.1 Q?.6@8490,4119.1 Q?.7@8440,4119.1 Q?.8@8390,4119.1 Q?.8@8465,4024.01 R?.1@9600.3,4115 U?.1@9120,3870 U?.2@9120,4070
VBUS: Q?.2@14535,3285.2
VBUS_EN: R?.1@9720.3,3610
VCC: C?.2@12152.58,3605 C?.2@12322.58,3605 R?.2@11979.7,3610 U?.1@13207.68,3536.61 U?.2@13207.68,3562.2
VCC_3V3: C?.1@7087.42,2910 C?.1@7257.42,2910 C?.1@7427.42,2910 C?.1@7597.42,2910 C?.1@7767.42,2910 C?.1@7937.42,2910 C?.1@11417.42,3605 C?.2@15252.58,2445 C?.2@15422.58,2445 C?.2@15592.58,2445 C?.2@15762.58,2445 C?.2@15932.58,2445 C?.2@16102.58,2445 C?.2@16442.58,2445 H?.1@16240,2025 R?.1@7521.6,3142.2 R?.1@8890.3,2450 R?.2@10429.7,3610 R?.2@13534.7,2450 R?.2@13704.7,2450 R?.2@13874.7,2450 R?.2@14044.7,2450 R?.2@14214.7,2450 U?.5@9708.39,2910.24 U?.5@9883.39,2910.24 U?.5@10063.39,2910.24 U?.5@10892.6,3610.42 U?.6@9682.8,2910.24 U?.6@9857.8,2910.24 U?.6@10037.8,2910.24 U??.1 U??.20 U??.21 U??.24 U??.36 U??.48
VCC_5V: C?.1@7940.63,3600 C?.1@8320.63,3600 C?.1@9152.42,3605 C?.1@11532.42,2445 C?.1@11587.42,3605 L?.1 P?.1 R?.2@8579.7,3610 R?.2@8779.7,2450 U?.1@10892.6,3519.58 U?.3@10967.4,3519.58
VN: U??.28
VP: U??.31
W: Q?.1@10505,3880.91 Q?.2@10555,3880.91 Q?.3@10605,3880.91 Q?.5@8815,4119.1 Q?.6@8765,4119.1 Q?.7@8715,4119.1 Q?.8@8665,4119.1 Q?.8@8740,4024.01 R?.1@9770.3,4115 U?.1@9290,3870 U?.2@9290,4070
WN: U??.29
WP: U??.32
pads on no net: C?.1@7087.42,3605 C?.1@8617.42,2910 C?.1@8787.42,2910 C?.1@8957.42,2910 C?.1@10547.42,3605 C?.1@12339.88,4005 C?.1@16997.42,4110 C?.1@17167.42,4110 C?.1@17337.42,4110 C?.1@17507.42,4110 C?.2@8672.58,2910 C?.2@8842.58,2910 C?.2@9207.58,3605 C?.2@9462.58,2445 C?.2@10602.58,3605 C?.2@10785,4102.7 C?.2@10955,4102.7 C?.2@11125,4102.7 C?.2@11295,4102.7 C?.2@11465,4102.7 C?.2@11635,4102.7 C?.2@11757.58,2445 C?.2@11805,4102.7 C?.2@11975,4102.7 C?.2@12145,4102.7 C?.2@12157.58,2445 C?.2@12327.58,2445 C?.2@13997.58,3605 C?.2@14347.58,4110 C?.2@14517.58,4110 C?.2@14877.58,4110 C?.2@15047.58,4110 C?.2@15222.58,4110 C?.2@15392.58,4110 C?.2@16197.58,4110 C?.2@16367.58,4110 C?.2@17052.58,4110 C?.2@17222.58,4110 C?.2@17392.58,4110 C?.2@17562.58,4110 D?.1@13203.84,4110 D?.1@13393.84,4110 D?.1@13583.84,4110 D?.1@14623.84,4110 D?.1@15493.84,4110 D?.1@15683.84,4110 D?.2@13839.37,3600 L?.2 LED?.2@8865.2,3609.5 LED?.2@13190.2,2449.5 Q?.1@8665,3880.91 Q?.1@14625.16,3554.8 Q?.2@8715,3880.91 Q?.3@8765,3880.91 Q?.5@10110,4119.1 Q?.5@10380,4119.1 Q?.5@10655,4119.1 Q?.6@10060,4119.1 Q?.6@10330,4119.1 Q?.6@10605,4119.1 Q?.7@10010,4119.1 Q?.7@10280,4119.1 Q?.7@10555,4119.1 Q?.8@9960,4119.1 Q?.8@10035,4024.01 Q?.8@10230,4119.1 Q?.8@10305,4024.01 Q?.8@10505,4119.1 Q?.8@10580,4024.01 R?.1@7250.3,3610 R?.1@7253.5,4070 R?.1@7423.5,4070 R?.1@7930.3,4115 R?.1@8100.3,2915 R?.1@8270.3,2915 R?.1@8440.3,2915 R?.1@8520.3,3610 R?.1@8720.3,2450 R?.1@9060.3,2450 R?.1@9120.3,2915 R?.1@9290.3,2915 R?.1@9550.3,3610 R?.1@10370.3,3610 R?.1@10420.3,2450 R?.1@10710.3,3610 R?.1@12945.3,3610 R?.1@13475.3,2450 R?.1@13815.3,2450 R?.1@13985.3,2450 R?.1@14155.3,2450 R?.2@7141.5,4070 R?.2@7309.7,3610 R?.2@7620,3142.2 R?.2@8199.7,3610 R?.2@8949.7,2450 R?.2@9289.7,2450 R?.2@9349.7,2915 R?.2@9519.7,2915 R?.2@9969.7,2450 R?.2@10139.7,2450 R?.2@10309.7,2450 R?.2@10769.7,3610 R?.2@11299.7,3610 R?.2@12759.7,4115 R?.2@12929.7,4115 R?.2@13099.7,4115 R?.2@13839.7,4115 R?.2@14009.7,4115 R?.2@14179.7,4115 SCREW?.1 SW?.2 U?.1@9631.61,2679.76 U?.1@9806.61,2679.76 U?.1@9986.61,2679.76 U?.1@15880,3888.5 U?.1@16480,3888.5 U?.1@16735,3888.5 U?.1@17705,4101.61 U?.1@17875,4101.61 U?.1@18045,4101.61 U?.2@9657.21,2679.76 U?.2@9832.21,2679.76 U?.2@15930,3888.5 U?.2@16785,3888.5 U?.2@17705,3928.39 U?.2@17875,3928.39 U?.2@18045,3928.39 U?.3@9682.8,2679.76 U?.3@9857.8,2679.76 U?.3@10037.8,2679.76 U?.3@13207.68,3587.79 U?.3@15980,3888.5 U?.3@16580,3888.5 U?.4@10967.4,3610.42 U?.5@13112.32,3613.39 U?.5@16030,4101.5 U?.5@16630,4101.5 U?.5@16885,4101.5 U?.6@16580,4101.5 U?.6@16835,4101.5 U?.7@13112.32,3562.2 U?.7@15930,4101.5 U?.7@16530,4101.5 U?.7@16785,4101.5 U?.8@9806.61,2910.24 U?.8@9986.61,2910.24 U?.8@15880,4101.5 U?.8@16480,4101.5 U?.8@16735,4101.5 U??.17